# Altium PCB PCB-LAYOUT.PcbDoc (part 3 of 3)
Units mm, origin at the board's own origin, x right, y up, seen from the top; angles counter-clockwise.
Board outline 90 x 80.5 mm, 4 copper layers (Top Layer, Int1 (GND), Int2 (PWR), Bottom Layer), stack 1.564 mm thick; 224 components, 118 nets, 645 pads, 657 vias.
Unrouted connection lines stored in the file: 1.
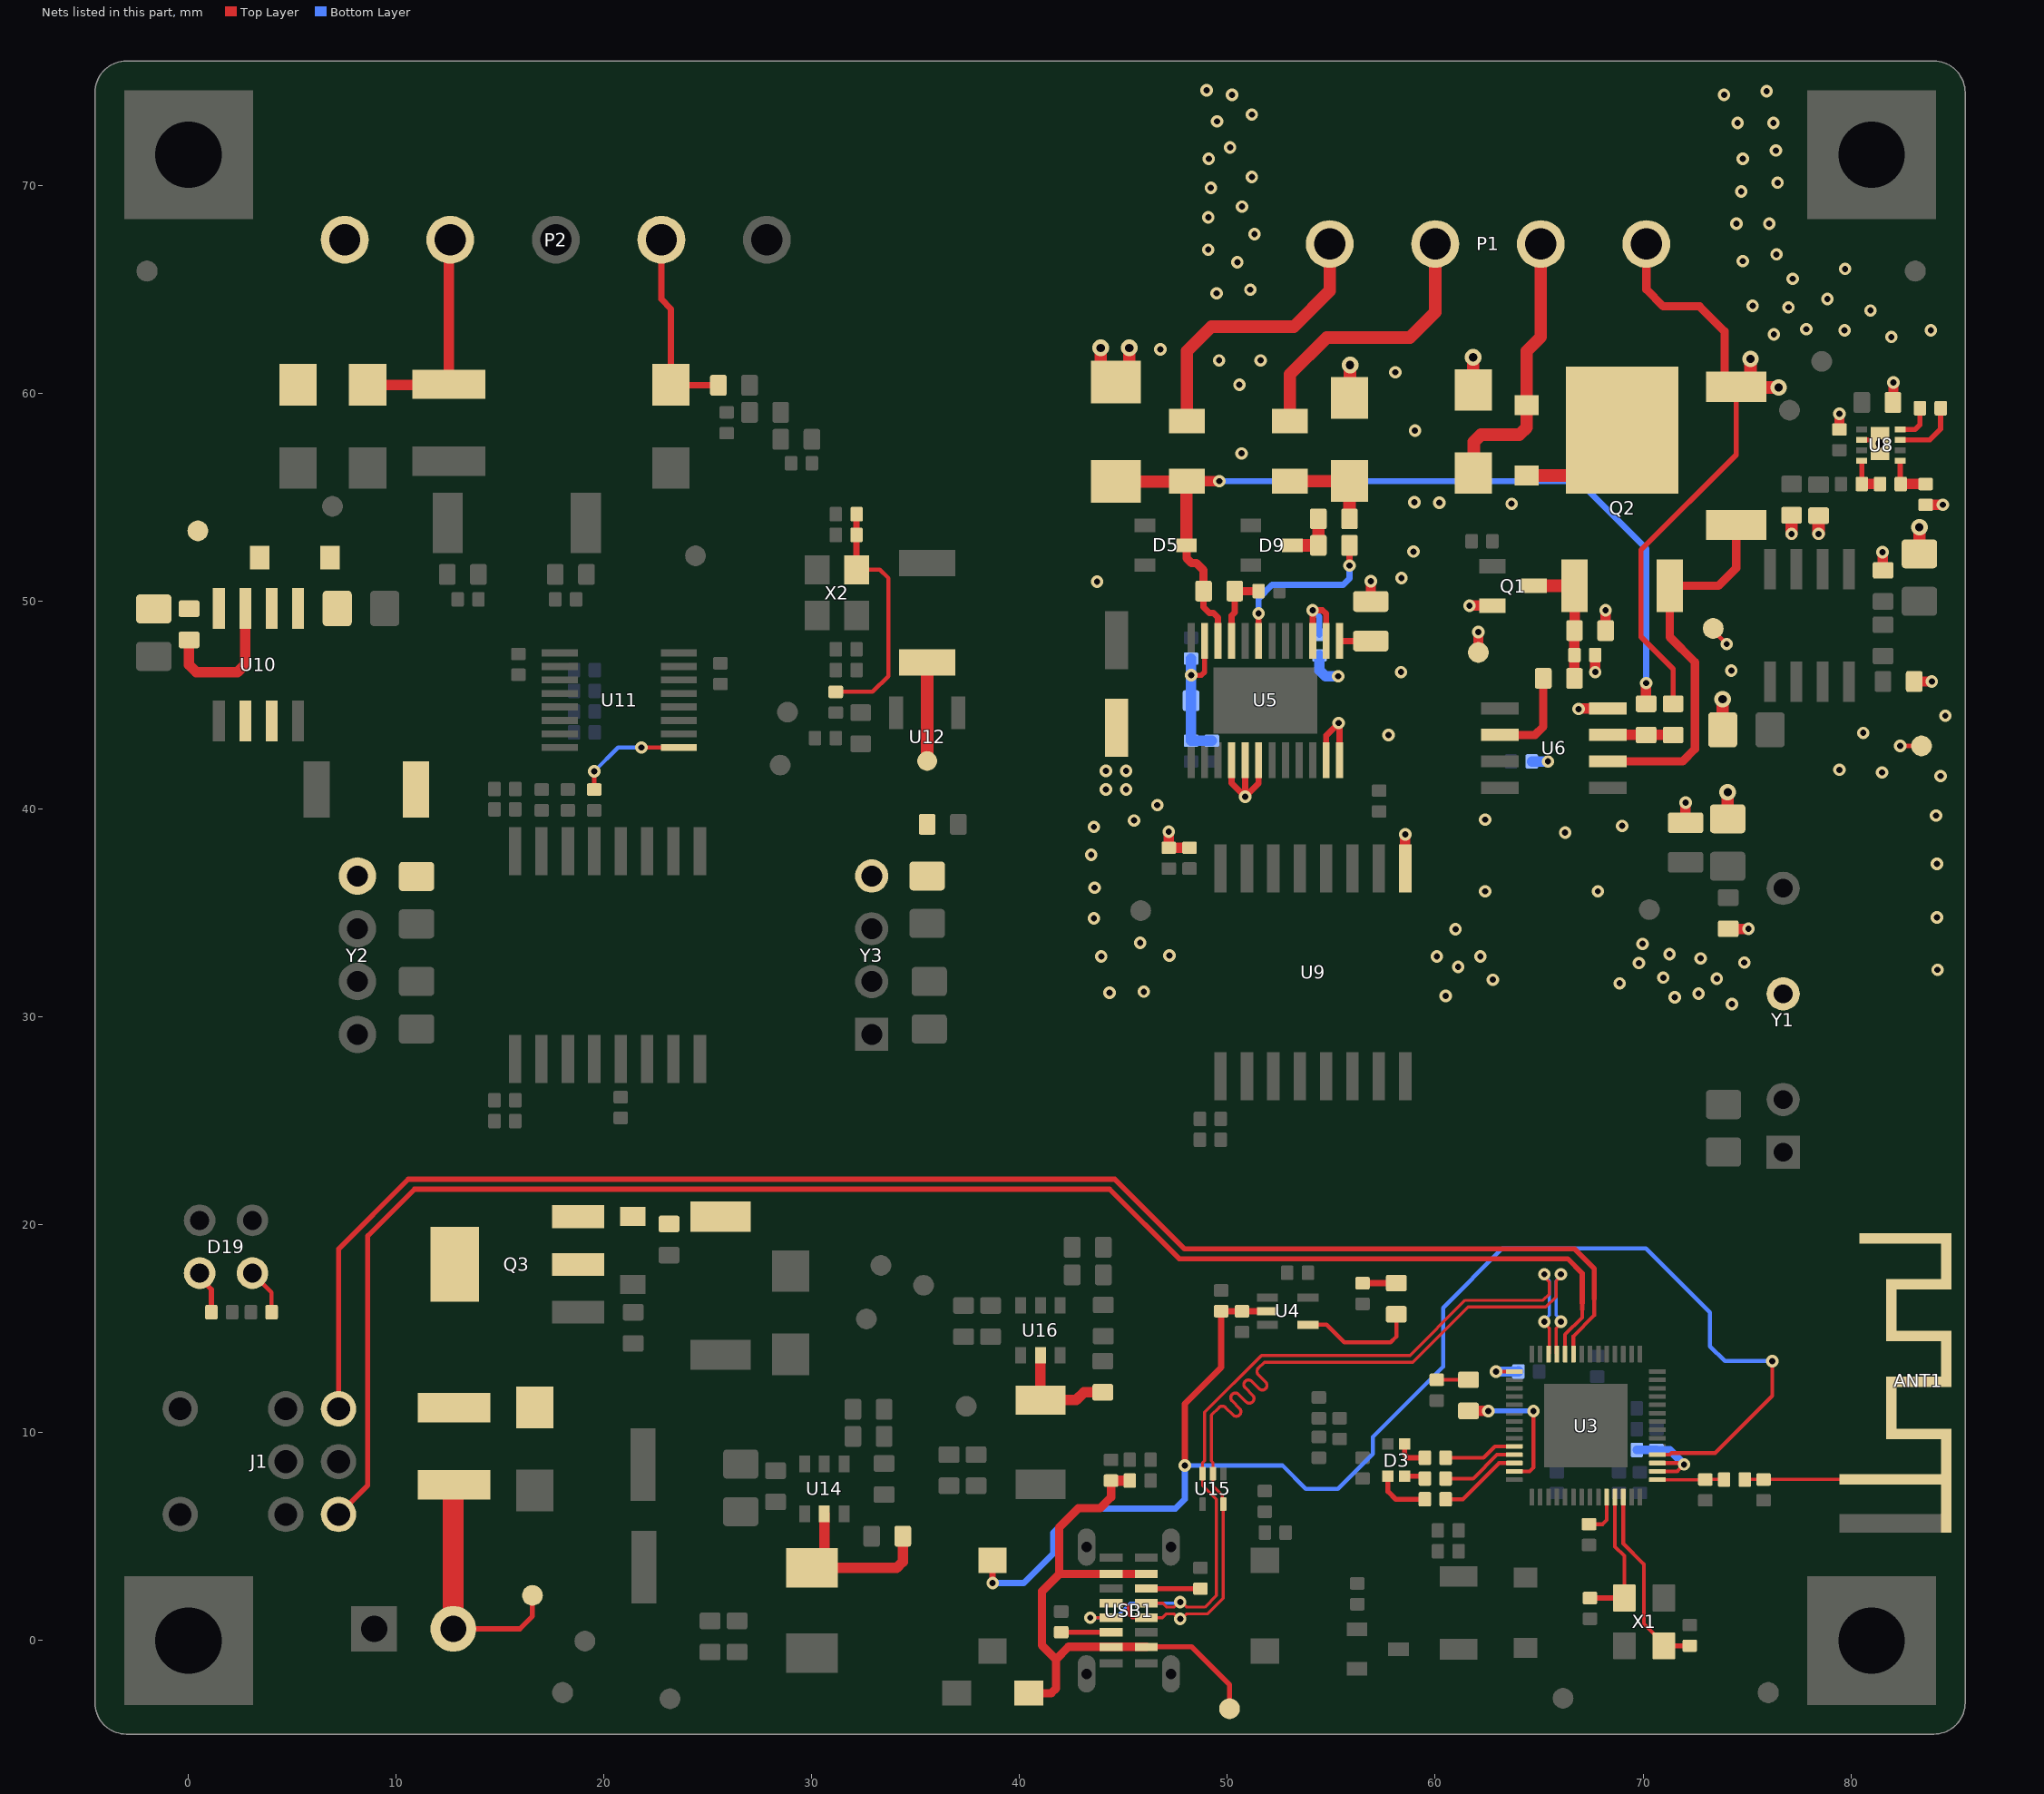
[diagram p5: the nets of this part, all layers, seen from the top]

## Via types
v1: diameter 0.6, hole 0.3, Top Layer to Bottom Layer, tented both sides, 570 vias
v2: diameter 1, hole 0.4, Top Layer to Bottom Layer, tented both sides, 48 vias
v3: diameter 0.8, hole 0.4, Top Layer to Bottom Layer, tented both sides, 36 vias
v4: diameter 1, hole 0.5, Top Layer to Bottom Layer, tented both sides, 3 vias

## Nets (pads, with @x,y where several pads share a name; then routed paths per layer and width w, separated by ;. In a path a pad name is that pad's centre, name@x,y a point inside that pad or via, vN(x,y) a via of type N, cw(c..) or ccw(c..) an arc to the next point about the centre after c; other vN are vias at no path point) (continued)
GND_2: C19.1 C20.1 C21.1 C22.1 C23.2 C25.1 C26.1 C27.2 C28.1 C30.1 C31.1 C34.1 C35.1 C36.1 C37.1 C38.1 C39.1 C41.1 D7.2 D8.2 D10.1 P1.1 Q1.S R11.2 R13.1 R16.2 R20.1 R21.1 R23.1 R24.1 R27.1 T5.1 T6.1 T7.1 U5.4 U5.5 U5.6 U5.11 U5.12 U5.23 U6.4 U8.2 U8.9 U9.9 Y1.4 | length 81.2
  Top Layer w0.2: T7.1@73.375,48.7 73.375,48.6 v1(74.025,47.95) ; v1(82.375,43.05) T6.1@83.4,43.05
  Top Layer w0.25: v1(48.25,46.45) 48.75,46.45 48.901,46.601 U5.23@48.901,48.1 ; R20.1@71.45,45.075 71.45,46.75 69.9,48.3 69.9,52.475 74.483,57.058 R16.2@74.483,60.325 ; U8.2@80.523,57.776 81.224,57.776 v3(81.4,57.6)
  Top Layer w0.3: U5.4@50.199,42.367 50.199,41.251 v1(50.85,40.6) ; U5.5@50.849,42.367 50.85,42.366 v1(50.85,40.6) ; U5.6@51.499,42.367 51.499,41.249 v1(50.85,40.6) ; U5.11@54.75,42.367 54.75,43.55 v1(55.35,44.15) 55.4,44.1 U5.12@55.4,42.367
  Top Layer w0.4: P1.1@70.16,67.2 70.16,65.015 70.975,64.2 72.725,64.2 73.925,63 73.925,60.85 74.45,60.325 R16.2@74.483,60.325
  Top Layer w0.5: v1@47.175,38.925 C34.1@47.175,38.15 C35.1@48.175,38.15 ; R23.1@56.9,50 v1(56.9,50.975) ; U9.9@58.558,37.157 v1(58.558,38.792) ; v1(61.65,49.8) Q1.S@62.75,49.8 ; T5.1@62.075,47.55 v1(62.075,48.525) ; v1(66.9,44.825) 66.927,44.825 66.95,44.848 U6.4@68.308,44.848 ; v1(67.7,46.6) C19.1@67.7,47.425 ; R11.2@68.2,48.6 v1(68.2,49.575) ; R13.1@72.05,39.35 v1(72.05,40.325) ; C26.1@74.1,34.25 v1(75.075,34.25) ; R16.2@74.483,60.325 74.725,60.325 R16.2@75.2,60.8 ; C41.1@79.452,58.276 v1(79.452,59.026) ; v1(81.525,52.375) 81.538,52.362 81.538,51.513 R21.1@81.55,51.5 ; C36.1@82.049,59.623 v1(82.049,60.54) ; R24.1@83.05,46.15 v1(83.9,46.15) ; R27.1@83.602,54.65 v1(84.425,54.65)
  Top Layer w0.6: v3(43.9,62.2) 43.9,61.276 44.624,60.552 D7.2@44.625,60.552 45.275,61.202 v3(45.275,62.2) ; D10.1@55.87,59.797 55.9,59.827 v3(55.9,61.375) ; v3(61.825,61.75) 61.825,60.18 D8.2@61.83,60.176 ; C27.2@73.828,43.822 v3(73.828,45.297) ; C25.1@74.075,39.543 v3(74.075,40.825) ; v3(75.175,61.675) 75.175,60.825 R16.2@75.2,60.8 ; R16.2@75.675,60.3 v3(76.525,60.3) ; v1(77.15,53.25) C37.1@77.15,54.15 ; v1(78.45,53.25) C38.1@78.45,54.125 ; C28.1@83.3,52.293 v3(83.3,53.575)
  Bottom Layer w0.5: C22.1@48.25,47.25 v1(48.25,46.45) C30.1@48.25,45.225 C31.1@48.25,43.3 C20.1@49.25,43.3 ; C21.1@54.425,47.4 54.425,46.693 54.718,46.4 v1(55.325,46.4) ; C39.1@64.65,42.3 v1(65.425,42.3) ; v1(75.075,34.25) cw(c75.075,34.225) v1@75.1,34.225
  other v1: 74.275,30.625 71.525,30.95 60.5,31.025 72.675,31.125 44.325,31.175 45.975,31.225 68.875,31.625 62.775,31.8 73.55,31.85 70.975,31.9 84.175,32.275 61.104,32.417 69.8,32.6 74.875,32.625 72.775,32.825 43.925,32.925 60.075,32.925 62.175,32.925 47.204,32.962 71.275,33.025 69.975,33.525 45.8,33.575 60.975,34.225 43.575,34.75 84.15,34.8 62.4,36.05 67.825,36.05 43.6,36.225 84.15,37.375 43.444,37.807 66.25,38.875 47.175,38.925 43.575,39.15 69,39.2 45.507,39.463 62.4,39.5 84.1,39.7 46.625,40.2 44.15,40.95 45.125,40.95 84.325,41.6 81.5,41.775 44.15,41.85 45.125,41.85 79.45,41.9 57.75,43.575 80.6,43.675 84.55,44.5 58.35,46.6 74.25,46.675 43.725,50.95 58.375,51.125 58.95,52.4 63.675,54.7 60.2,54.75 59,54.775 50.675,57.125 59.025,58.225 50.575,60.425 58.075,61.025 49.6,61.6 51.6,61.6 46.775,62.125 81.95,62.725 76.3,62.85 79.7,63.05 83.85,63.05 77.862,63.1 80.95,64 77,64.15 75.275,64.222 78.875,64.55 49.475,64.825 51.1,65 77.2,65.525 79.725,66 50.475,66.325 74.8,66.375 76.425,66.7 49.075,66.925 51.3,67.675 74.5,68.175 76.075,68.175 49.079,68.48 50.7,69 74.725,69.725 49.2,69.9 76.475,70.15 51.175,70.425 49.1,71.3 74.8,71.3 76.4,71.7 50.125,71.85 74.55,73.025 76.275,73.025 49.5,73.1 51.175,73.425 50.225,74.375 73.9,74.375 75.95,74.55 49,74.6
GPIO36: D2.A U3.41 | length 6.8
  Top Layer w0.18: U3.41@63.805,8.145 64.545,8.145 64.725,8.325 v1(64.725,11.05)
  Top Layer w0.5: D2.A@61.6,11.05 v1(62.55,11.05)
  Bottom Layer w0.25: v1(62.55,11.05) v1(64.725,11.05)
GPIO46: R3.2 U3.52 | length 2
  Top Layer w0.18: R3.2@67.4,5.6 68.05,5.6 68.25,5.8 U3.52@68.25,6.9
I_OUT: F2.2 P1.3 | length 13.8
  Top Layer w0.6: F2.2@53.001,58.677 53.001,60.926 54.775,62.7 58.775,62.7 60,63.925 P1.3@60,67.2
I_OUT_R: R17.1 U5.19 | length 8.4
  Top Layer w0.3: U5.19@51.499,48.1 v1(51.499,49.424) ; v1(55.875,51.725) R17.1@55.875,52.7
  Bottom Layer w0.3: v1(51.499,49.424) 51.499,50.149 52.15,50.8 55.575,50.8 55.875,51.1 v1(55.875,51.725)
I_OUT_RR: D9.3 R17.2 R18.1 | length 2.5
  Top Layer w0.6: D9.3@53.126,52.701 R17.2@54.374,52.701 ; R17.2@54.375,52.7 R18.1@54.375,53.975
I_OUT_RRF: D10.2 F2.1 R18.2 | length 4.7
  Top Layer w0.6: F2.1@53.001,55.787 55.858,55.787 55.875,55.77 R18.2@55.875,53.975
LED1.BK: D3.4 R9.2 | length 2.7
  Top Layer w0.25: D3.4@57.725,7.907 57.725,7.175 58.1,6.8 R9.2@59.5,6.8
LED1.GK: D3.2 R7.2 | length 1
  Top Layer w0.25: D3.2@58.525,7.907 59.393,7.907 R7.2@59.5,7.8
LED1.RK: D3.1 R6.2 | length 1.5
  Top Layer w0.25: D3.1@58.525,9.457 58.525,8.946 58.671,8.8 R6.2@59.5,8.8
LED_+5V_FIELD_PWR: D19.4 R53.2 | length 2.1
  Top Layer w0.25: D19.4@0.535,17.681 0.535,17.463 1.1,16.898 R53.2@1.1,15.8
LED_+5V_USB_PWR: D19.2 R54.2 | length 2.3
  Top Layer w0.2: D19.2@3.075,17.681 4,16.756 R54.2@4,15.8
LM_VOUT: C47.2 D11.2 D12.1 P2.5 R28.2 T8.1 U10.4
LM_VOUT_R: R28.1 U10.2 U10.3 U10.6 U10.7 | length 6.9
  Top Layer w0.5: R28.1@0.025,48.15 0.025,46.95 0.375,46.6 2.35,46.6 2.731,46.981 U10.3@2.731,49.663
LM_VOUTT: R25.1 R26.2 U8.4 | length 2
  Top Layer w0.25: U8.4@80.523,56.776 80.527,56.772 R25.1@80.527,55.651
  Top Layer w0.5: R25.1@80.527,55.651 R26.2@81.402,55.651
LNA_IN: C11.2 L2.1 U3.1 | length 3.2
  Top Layer w0.151: U3.1@70.695,7.745 C11.2@72.995,7.745 ; C11.2@73,7.75 L2.1@73.9,7.75
LNA_IN_A: ANT1.1 C12.2 L2.2 | length 7
  Top Layer w0.151: L2.2@74.9,7.75 ANT1.1@81.9,7.75
M+: D13.1 F3.2 P2.4 | length 10.9
  Top Layer w0.5: D13.1@8.62,60.422 12.493,60.422 F3.2@12.525,60.454 12.525,67.334 P2.4@12.596,67.405
MCU_LEDB: R9.1 U3.40 | length 4
  Top Layer w0.18: R9.1@60.5,6.8 61.325,6.8 63.07,8.545 U3.40@63.805,8.545
MCU_LEDG: R7.1 U3.39 | length 3.8
  Top Layer w0.18: R7.1@60.5,7.8 61.825,7.8 62.97,8.945 U3.39@63.805,8.945
MCU_LEDR: R6.1 U3.38 | length 3.5
  Top Layer w0.18: R6.1@60.5,8.8 62.325,8.8 62.87,9.345 U3.38@63.805,9.345
MCU_OSC_+: C14.2 U3.53 X1.1 | length 6.7
  Top Layer w0.18: U3.53@68.65,6.9 68.65,4.525 69.1,4.075 X1.1@69.1,2.05
  Top Layer w0.25: C14.2@67.45,2.05 X1.1@69.1,2.05
MCU_OSC_-: C13.2 U3.54 X1.3 | length 9.2
  Top Layer w0.18: U3.54@69.05,6.9 69.05,4.675 70.05,3.675 70.05,0.8 70.54,0.31 71,-0.15 X1.3@71,-0.25
  Top Layer w0.25: X1.3@71,-0.25 C13.2@72.25,-0.25
MCU_PWR_BANK: J1.4 U3.24 | length 79.3
  Top Layer w0.18: U3.24@66.25,13.79 66.25,14.725 67.075,15.55 67.075,15.925
  Top Layer w0.2: 67.075,15.925 67.075,16.25
  Top Layer w0.25: J1.4@7.22,6.072 8.625,7.477 8.625,19.475 10.875,21.725 44.325,21.725 47.675,18.375 66.375,18.375 67.075,17.675 67.075,16.25
MCU_PWR_FIELD: J1.6 U3.23 | length 75.8
  Top Layer w0.18: U3.23@66.65,13.79 66.65,14.65 67.65,15.65 67.65,16.075
  Top Layer w0.2: 67.65,16.075 67.65,16.45
  Top Layer w0.25: J1.6@7.22,11.152 7.22,18.845 10.575,22.2 44.575,22.2 47.925,18.85 66.7,18.85 67.65,17.9 67.65,16.45
NetC40_1: C40.1 U8.7 | length 3.2
  Top Layer w0.25: U8.7@82.377,57.776 83.801,57.776 84.325,58.3 C40.1@84.325,59.3
NetC40_2: C40.2 U8.8 | length 1.8
  Top Layer w0.25: U8.8@82.377,58.277 83.102,58.277 83.325,58.5 C40.2@83.325,59.3
NetD2_K: D2.K R2.2 | length 1.5
  Top Layer w0.18: R2.2@60.075,12.55 D2.K@61.6,12.55
NetR23_2: R23.2 U5.13 | length 1.5
  Top Layer w0.3: U5.13@55.4,48.1 R23.2@56.9,48.1
NRST: C17.2 R5.1 SW1.2 U3.4 U4.2 | length 71.8
  Top Layer w0.18: U3.4@70.695,8.945 71.295,8.945 71.375,9.025 73.475,9.025 76.226,11.776 76.226,13.449 v1(76.225,13.45)
  Top Layer w0.3: v1(38.7,2.775) SW1.2@38.7,3.861 ; v1(47.95,8.425) 47.95,11.4 49.7,13.15 R5.1@49.7,15.85 C17.2@50.7,15.85 U4.2@51.925,15.85
  Bottom Layer w0.2: v1(47.95,8.425) 52.65,8.425 53.775,7.3 55.325,7.3 57,8.975 57,9.8 60.383,13.183 60.383,16.019 63.228,18.864 70.149,18.864 73.225,15.788 73.225,14.163 73.938,13.45 v1(76.225,13.45)
  Bottom Layer w0.3: v1(38.7,2.775) 40.2,2.775 41.625,4.2 41.625,5.2 42.775,6.35 47.5,6.35 47.95,6.8 v1(47.95,8.425)
OP_+: R19.1 R20.2 U6.3 | length 3.1
  Top Layer w0.5: U6.3@68.308,43.578 68.311,43.575 R19.1@70.15,43.575 R20.2@71.45,43.575
OP_-: Q2.3 R16.1 U6.2 | length 18.4
  Top Layer w0.4: U6.2@68.308,42.308 71.908,42.308 72.5,42.9 72.5,47.075 71.285,48.29 Q2.3@71.285,50.754 73.629,50.754 74.483,51.608 R16.1@74.483,53.675
OP_-_VOUT: R10.1 U6.6 | length 4.6
  Top Layer w0.4: U6.6@63.109,43.578 64.803,43.578 65.2,43.975 R10.1@65.2,46.3
OP_-_VOUT_R: C19.2 Q1.D Q2.1 R10.2 R11.1 | length 6.4
  Top Layer w0.5: R10.2@66.7,46.3 C19.2@66.7,47.425 R11.1@66.7,48.6 66.704,48.604 66.704,50.747 Q2.1@66.708,50.751
  Top Layer w0.6: Q1.D@64.75,50.75 64.751,50.751 Q2.1@66.708,50.751
REFOUT: C21.2 U5.14 U5.15 | length 4.8
  Top Layer w0.3: U5.15@54.1,48.1 v1(54.1,49.575) 54.575,49.575 54.75,49.399 U5.14@54.75,48.1
  Bottom Layer w0.3: v1(54.1,49.575) 54.425,49.249 C21.2@54.425,48.4
S_V_SYS: C70.2 D15.1 Q3.3 R45.1
SCLK_R: R31.1 U11.1 | length 5.4
  Top Layer w0.2: R31.1@19.525,40.95 v1(19.525,41.825) ; v1(21.8,42.975) U11.1@23.599,42.975
  Bottom Layer w0.2: v1(19.525,41.825) 20.675,42.975 v1(21.8,42.975)
SINK+: D6.2 D8.1 P1.2 | length 13.5
  Top Layer w0.6: D8.1@61.83,56.178 61.851,56.199 61.851,57.674 62.202,58.025 64.052,58.025 64.404,58.376 D6.2@64.404,59.448 64.404,62.054 65.08,62.73 P1.2@65.08,67.2
SINK+_D: D6.1 Q2.2 | length 5.5
  Top Layer w0.6: D6.1@64.404,56.062 66.812,56.062 Q2.2@68.994,58.244
SW: C69.1 L3.1 U14.5 | length 8.6
  Top Layer w0.5: U14.5@30.6,6.1 30.6,4.1 L3.1@30,3.5 34.082,3.5 34.375,3.793 C69.1@34.375,5.025
SW1: C79.1 L4.1 U16.5 | length 5.3
  Top Layer w0.5: U16.5@41.002,13.732 41,13.73 L4.1@41,11.575 42.725,11.575 43.099,11.949 43.999,11.949 C79.1@44,11.95
TRIG_LED_A: D4.A U4.4 | length 5.8
  Top Layer w0.2: U4.4@53.875,15.2 54.775,15.2 55.625,14.35 57.85,14.35 58.125,14.625 D4.A@58.125,15.7
TRIG_LED_K: D4.K R8.2 | length 1.6
  Top Layer w0.3: R8.2@56.5,17.2 D4.K@58.125,17.2
USB-C_MCU_CC1: R52.2 USB1.A5 | length 2.6
  Top Layer w0.25: USB1.A5@46.1,2.502 R52.2@48.698,2.502
USB-C_MCU_CC2: R51.2 USB1.B5 | length 2.4
  Top Layer w0.25: R51.2@42,0.4 42.002,0.401 USB1.B5@44.398,0.401
USB-C_MCU_D_N: U3.25 U15.2 U15.5 USB1.A7 USB1.B7 | length 44.3
  Top Layer w0.146: USB1.B7@44.431,1.768 45.082,1.768 45.225,1.625 45.225,1.275 45.4,1.1 46.879,1.1 47.066,1.288 47.412,1.288 47.65,1.05 v1(47.725,1.05) 47.801,1.05 48.038,1.287 49.048,1.287 49.8,2.039 U15.5@49.8,6.565 49.755,6.61 49.755,6.995 49.3,7.45 U15.2@49.3,8.035 49.3,8.575 49.225,8.65 49.225,10.85 49.592,11.217 cw(c49.75,11.059) 49.907,11.217 50.265,10.859 ccw(c50.423,11.017) 50.58,10.859 ccw(c50.423,11.017) 50.58,11.175 50.223,11.532 cw(c50.38,11.69) 50.223,11.848 cw(c50.38,11.69) 50.538,11.848 50.896,11.49 ccw(c51.053,11.648) 51.211,11.49 ccw(c51.053,11.648) 51.211,11.805 50.853,12.163 cw(c51.011,12.321) 50.853,12.478 cw(c51.011,12.321) 51.169,12.478 51.523,12.124 ccw(c51.681,12.282) 51.839,12.124 ccw(c51.681,12.282) 51.839,12.439 51.484,12.794 cw(c51.642,12.952) 51.484,13.109 51.774,13.399 51.799,13.399 58.924,13.399 61.574,16.049 65.324,16.049 65.813,16.538 65.813,17.3 66.05,17.537 v1(66.05,17.625) ; U3.25@65.85,13.79 65.813,13.827 65.813,15.037 66.05,15.274 v1(66.05,15.35)
  Bottom Layer w0.146: v1(66.05,15.35) 66.05,15.426 65.813,15.663 65.813,17.312 66.05,17.549 v1(66.05,17.625)
USB-C_MCU_D_P: U3.26 U15.3 USB1.A6 USB1.B6 | length 42.8
  Top Layer w0.146: v1(43.4,1.1) USB1.B6@44.398,1.1 ; USB1.A6@46.1,1.801 46.899,1.801 47.086,1.614 47.412,1.614 47.649,1.85 v1(47.725,1.85) 47.801,1.85 48.038,1.613 48.913,1.613 49.474,2.174 49.474,6.801 48.8,7.475 U15.3@48.8,8.035 48.8,8.55 48.899,8.649 48.899,10.985 51.639,13.725 58.789,13.725 61.439,16.375 65.189,16.375 65.487,16.673 65.487,17.265 65.25,17.502 v1(65.25,17.625) ; v1(65.25,15.35) 65.25,15.274 65.487,15.037 65.487,13.827 U3.26@65.45,13.79
  Bottom Layer w0.146: v1(43.4,1.1) 44.625,1.1 45.325,1.8 47.675,1.8 v1(47.725,1.85) ; v1(65.25,15.35) 65.25,15.426 65.487,15.663 65.487,17.312 65.25,17.549 v1(65.25,17.625)
V+: D14.1 P2.2 R40.1 | length 9.5
  Top Layer w0.3: P2.2@22.756,67.405 22.756,64.544 23.22,64.08 D14.1@23.22,60.422 23.243,60.4 R40.1@25.5,60.4
V_IN: F4.1 P3.2 T13.1 | length 12
  Top Layer w0.25: P3.2@12.744,0.567 15.942,0.567 16.55,1.175 T13.1@16.55,2.175
  Top Layer w1: P3.2@12.744,0.567 12.744,7.465 F4.1@12.775,7.496
V_IN_F: D16.1 F4.2 Q3.2
V_OUT: F1.2 P1.4 | length 13.7
  Top Layer w0.6: F1.2@48.051,58.677 48.051,62.051 49.225,63.225 53.2,63.225 54.92,64.945 P1.4@54.92,67.2
V_OUT_R: C29.1 R14.1 U5.21 | length 3.6
  Top Layer w0.3: U5.21@50.199,48.1 50.199,49.324 50.35,49.475 R14.1@50.35,50.5
  Top Layer w0.4: R14.1@50.35,50.5 C29.1@51.5,50.5
V_SENSE: D5.3 D7.1 F1.1 R14.2 R19.2 U5.22 | length 42.9
  Top Layer w0.3: R14.2@48.85,50.5 48.85,49.725 49.125,49.45 49.325,49.45 49.551,49.224 U5.22@49.551,48.1
  Top Layer w0.4: D5.3@48.026,52.701 48.039,52.688 48.039,52.084 48.274,51.85 48.5,51.85 48.85,51.5 R14.2@48.85,50.5
  Top Layer w0.5: F1.1@48.051,55.787 v1(49.613,55.787) ; R19.2@70.15,45.075 v1(70.15,46.075)
  Top Layer w0.6: D7.1@44.625,55.77 F1.1@48.033,55.77 ; D5.3@48.026,52.701 48.026,55.762 F1.1@48.033,55.77 ; F1.1@48.051,55.787 F1.1@48.033,55.77
  Bottom Layer w0.3: v1(49.613,55.787) 66.913,55.787 70.15,52.55 v1(70.15,46.075)
VBUS: C74.2 D18.2 FB1.1 T16.1 USB1.A4B9 USB1.B4A9 | length 29.3
  Top Layer w0.25: USB1.B4A9@46.1,-0.3 48.275,-0.3 50.1,-2.125 T16.1@50.1,-3.275
  Top Layer w0.4: D18.2@40.432,-2.531 41.519,-2.531 41.75,-2.3 41.75,-0.9 ; FB1.1@44.4,7.7 44.4,6.9 43.875,6.375 42.825,6.375 41.901,5.451 41.901,3.201 ; USB1.B4A9@46.1,-0.3 USB1.B4A9@44.398,-0.3 42.35,-0.3 41.75,-0.9 ; USB1.A4B9@46.1,3.201 USB1.A4B9@44.398,3.201 41.901,3.201 ; 41.75,-0.9 41.075,-0.225 41.075,2.375 41.901,3.201
  Top Layer w0.5: FB1.1@44.4,7.7 C74.2@45.3,7.7
VDD3P3: C5.2 L1.2 U3.2 U3.3 | length 5.3
  Top Layer w0.18: U3.2@70.695,8.145 71.645,8.145 v1(71.975,8.475) 71.905,8.545 U3.3@70.695,8.545
  Bottom Layer w0.4: C5.2@69.7,9.175 L1.2@70.65,9.175 70.665,9.16 71.29,9.16 v1(71.975,8.475)
VDD_SPI: C6.2 U3.29 | length 1.9
  Top Layer w0.18: v1(62.93,12.945) U3.29@63.805,12.945
  Bottom Layer w0.5: v1(62.93,12.945) 63.995,12.945 C6.2@64,12.95
VFB: R26.1 R27.2 U8.5 | length 2.3
  Top Layer w0.25: U8.5@82.377,56.776 82.377,55.676 R26.1@82.402,55.651
  Top Layer w0.5: R26.1@82.402,55.651 83.601,55.651 R27.2@83.602,55.65
VOUT_H_ISO: C45.1 C46.1 D11.1 R29.2 U10.1 Y2.4
VOUT_L_ISO: C54.2 C55.2 R37.2 U12.2 Y3.4 | length 4.7
  Top Layer w0.6: U12.2@35.549,42.326 R37.2@35.55,47.068 R37.2@35.55,47.068
XO: C57.2 C58.2 R38.2 X2.4 | length 11.9
  Top Layer w0.2: R38.2@31.15,45.65 32.925,45.65 33.675,46.4 33.675,51.125 33.275,51.525 X2.4@32.15,51.525
  Top Layer w0.3: X2.4@32.15,51.525 32.15,53.2 C58.2@32.15,54.2
pads on no net: FID1.1 FID2.1 FID3.1 FID4.1 U3.7 U3.8 U3.14 U3.21 U3.22 U3.27 U3.28 U3.30 U3.31 U3.32 U3.33 U3.34 U3.35 U3.36 U3.37 U3.44 U3.45 U3.47 U3.48 U3.49 U3.50 U3.51 U4.1 U5.16 U5.18 U5.20 U6.1 U6.5 U6.8 U7.5 U7.8 U10.5 U10.8 U13.12 U15.1 USB1.1 USB1.A8 USB1.B8 X2.1
copper on no net:
  other v2: -2.5,-2.5 2.5,-2.5 78.5,-2.5 83.5,-2.5 0,-2.3 81,-2.3 -1.6,-1.7 79.4,-1.7 1.7,-1.6 82.7,-1.6 -2.3,0 2.3,0 78.7,0 83.3,0 -1.7,1.6 79.3,1.6 1.6,1.7 82.6,1.7 0,2.3 81,2.3 -2.5,2.5 2.5,2.5 78.5,2.5 83.5,2.5 -2.5,69 2.5,69 78.5,69 83.5,69 0,69.2 81,69.2 -1.6,69.8 79.4,69.8 1.7,69.9 82.7,69.9 -2.3,71.5 2.3,71.5 78.7,71.5 83.3,71.5 -1.7,73.1 79.3,73.1 1.6,73.2 82.6,73.2 0,73.8 81,73.8 -2.5,74 2.5,74 78.5,74 83.5,74

## Polygon pours and split planes (outlines as drawn)
+5V_SYS on Top Layer "+5V_SYS_L01_P023" (solid, remove dead copper, pour order 23): 41.35,16.7 41.35,15.65 41.15,15.45 36.675,15.45 36.525,15.6 36.525,16.725 36.675,16.875 41.175,16.875
+3V3 on Top Layer "+3V3_L01_P022" (solid, remove dead copper, pour order 22): 38.892,8.175 36.3,8.175 35.975,7.85 35.975,6.525 37.2,5.3 41.025,5.3 42.625,6.9 42.625,8.4 42.1,8.925 40.183,8.925
GND_2 on Top Layer "GND_2_L01_P007" (solid, remove dead copper, pour order 7): 43.5,40.75 44.125,40.125 45.125,40.125 45.75,40.75 45.75,45.25 45.575,45.425 43.725,45.425 43.5,45.2
C_SOUND on Top Layer "C_SOUND_L01_P020" (solid, remove dead copper, pour order 20): 65.048,0.677 65.4,0.325 65.4,-1.025 65.025,-1.4 57.675,-1.4 57.45,-1.175 57.45,0.4 57.727,0.677
+5V_FIELD on Top Layer "+5V_FIELD_L01_P018" (solid, remove dead copper, pour order 18): 27.925,0.85 27.275,0.2 24.425,0.2 24.05,-0.175 24.05,-1.65 25.625,-3.225 31.25,-3.225 31.9,-2.575 31.9,0.475 31.525,0.85
+24V_FIELD on Top Layer "+24V_FIELD_L01_P016" (solid, remove dead copper, pour order 16): 25.125,7.55 30.5,7.55 31.05,8.1 31.05,9.125 30.075,10.1 30.075,12.225 30.625,12.775 30.625,14.75 30.176,15.199 24.573,15.223 20.225,10.875 20.225,6.75 20.85,6.125 23.7,6.125
S_V_SYS on Top Layer "S_V_SYS_L01_P014" (solid, pour order 14): 17.5,21.2 17.125,20.825 17.125,19.7 17.45,19.375 27.25,19.375 27.425,19.55 27.425,20.925 27.15,21.2
V_IN_F on Top Layer "V_IN_F_L01_P013" (solid, remove dead copper, pour order 13): 16.525,19.25 16.525,20.1 16.225,20.4 11.125,20.4 10.3,19.575 10.3,10.55 11.05,9.8 17.8,9.8 18.525,10.525 18.525,12.675 16.8,14.4 16.8,16.35 17.75,17.3 20.05,17.3 20.275,17.525 20.275,18.675 20.025,18.925 16.85,18.925
GND_1 on Top Layer "GND_1_L01_P003" (solid, remove dead copper, pour order 3): 7.25,35.25 6.825,34.825 6.825,33.625 7.175,33.275 13.225,33.275 13.45,33.5 13.45,34.875 13.075,35.25
ADC_5V_ISO on Top Layer "ADC_5V_ISO_L01_P009" (solid, pour order 9): 79.125,48.35 84.375,48.35 84.7,48.675 84.7,50.825 84.475,51.05 82.55,51.05 82.2,50.7 81.025,50.7 80.225,49.9 79.125,49.9 79.125,52.625 78.95,52.8 77,52.8 76.825,52.625 76.825,45.05 77.1,44.775 78.875,44.775 79.125,45.025
ADJ_LM on Top Layer "ADJ_LM_L01_P010" (solid, remove dead copper, pour order 10): 79.8,47.925 79.525,47.65 79.525,45.025 79.775,44.775 82.15,44.775 82.35,44.975 82.35,47.7 82.125,47.925
ADC_24_ISO on Top Layer "ADC_24_ISO_L01_P008" (solid, remove dead copper, pour order 8): 78.65,35.725 77.975,35.05 71.8,35.05 70.8,36.05 70.8,37.9 71.2,38.3 78.15,38.3 78.65,37.8
LM_VOUT on Top Layer "LM_VOUT_L01_P005" (solid, remove dead copper, pour order 5): 0.025,56.375 -3,53.35 -3,49.075 -2.575,48.65 -0.875,48.65 -0.525,49 0.55,49 0.875,48.675 0.875,48.475 1.025,48.325 1.65,48.325 1.825,48.5 1.825,50.825 2.25,51.25 4,51.25 4.3,51.55 4.3,52.875 3.625,53.55 3.625,58.05 4.475,58.9 6.125,58.9 6.65,59.425 6.65,63.15 9.8,66.3 9.8,68.6 8.7,69.7 6.425,69.7 0.025,63.3
LM_VOUT_R on Top Layer "LM_VOUT_R_L01_P004" (solid, pour order 4): 2.475,42.825 2.275,43.025 2.275,50.65 2.45,50.825 4.275,50.825 4.475,50.625 4.475,43.025 4.275,42.825
VOUT_H_ISO on Top Layer "VOUT_H_ISO_L01_P002" (solid, remove dead copper, pour order 2): 6.825,36.25 6.825,37.725 8.525,39.425 8.525,43.8 4.875,47.45 4.875,53 5.4,53.525 7.9,53.525 8.35,53.075 8.35,48.575 13.1,43.825 13.1,36.675 12.25,35.825 7.25,35.825
GND_1 on Top Layer "GND_1_L01_P001" (solid, remove dead copper, pour order 1): 37.7,35.3 32.15,35.3 31.675,34.825 31.675,33.725 32.125,33.275 37.675,33.275 38.1,33.7 38.1,34.9
VOUT_L_ISO on Top Layer "VOUT_L_ISO_L01_P000" (solid, pour order 0): 36.225,38.475 36.725,37.651 36.725,36.075 36.525,35.875 32.375,35.875 31.775,36.475 31.775,37.674 33.9,39.799 33.9,42.75 34.925,43.775 36.107,43.775 36.975,42.874 36.975,40.7 36.225,39.95
GND on Int1 (GND) "GND_L02_P027" (solid, remove dead copper, pour order 27): -3.2,30.5 -4.2,29.5 -4.2,-3 -2.9,-4.3 84.1,-4.3 85.2,-3.2 85.2,3.3 84.5,4 79.5,4 79.2,4.3 79.2,20.5 79.6,20.9 84.5,20.9 85.2,21.6 85.2,28.1 84.475,28.825 42.925,28.825 42.5,28.4 42.5,27.6 41.9,27 39.1,27 38.4,27.7 38.4,29.6 37.5,30.5
GND_2 on Int1 (GND) "GND_2_L02_P012" (solid, pour order 12): 43.2,75.7 42.3,74.8 42.3,30.975 43.45,29.825 83.9,29.825 85.2,31.125 85.2,74.8 84.275,75.7
GND_1 on Int1 (GND) "GND_1_L02_P011" (solid, pour order 11): -3.246,75.754 -4.2,74.8 -4.2,34 -3.2,33 37.7,33 38.7,34 38.7,74.8 37.801,75.699
+3V3 on Int2 (PWR) "+3V3_L03_P028" (solid, remove dead copper, pour order 28): -3.2,30.5 -4.2,29.5 -4.2,-3 -2.9,-4.3 84.1,-4.3 85.2,-3.2 85.2,3.3 84.5,4 79.5,4 79.2,4.3 79.2,20.5 79.6,20.9 84.5,20.9 85.2,21.6 85.2,28.1 84.475,28.825 42.925,28.825 42.5,28.4 42.5,27.6 41.9,27 39.1,27 38.4,27.7 38.4,29.6 37.5,30.5
GND_1 on Int2 (PWR) "GND_1_L03_P026" (solid, pour order 26): -3.246,75.754 -4.2,74.8 -4.2,34 -3.2,33 37.7,33 38.7,34 38.7,74.8 37.801,75.699
GND_2 on Int2 (PWR) "GND_2_L03_P025" (solid, pour order 25): 43.2,75.7 42.3,74.8 42.3,30.975 43.45,29.825 83.9,29.825 85.2,31.125 85.2,74.8 84.275,75.7
GND on Bottom Layer "GND_L04_P029" (solid, remove dead copper, pour order 29): -3.2,30.5 -4.2,29.5 -4.2,-3 -2.9,-4.3 84.1,-4.3 85.2,-3.2 85.2,3.3 84.5,4 79.5,4 79.2,4.3 79.2,20.5 79.6,20.9 84.5,20.9 85.2,21.6 85.2,28.1 84.475,28.825 42.925,28.825 42.5,28.4 42.5,27.6 41.9,27 39.1,27 38.4,27.7 38.4,29.6 37.5,30.5

## Keep-outs
Keep-Out Layer:
  region: 3.6,3.595 3.6,-3.7 -3.576,-3.7 -3.576,3.595
  region: 84.6,3.595 84.6,-3.7 77.424,-3.7 77.424,3.595
  region: 85.5,20.1 85.5,4.7 79.3,4.7 79.3,20.1
  region: 84.6,75.095 84.6,67.8 77.424,67.8 77.424,75.095
  region: 3.6,75.095 3.6,67.8 -3.576,67.8 -3.576,75.095
  region: 72.399,69.27 72.399,64.77 67.899,64.77 67.899,69.27
  region: 30.075,69.475 30.075,64.975 25.575,64.975 25.575,69.475
  region: 20,69.5 20,65 15.5,65 15.5,69.5

## Other copper
Top Layer:
  pour cut-out: 173 vertices and 0 holes, not listed, extent 74.34,4.946 85.104,19.854

## Silkscreen, mask and mechanical layers (free items; w line width, h text height)
Top Overlay:
  drawing of 38 lines, arcs and shapes, not listed
  text "L+" at 8.795,75.45 h2.5 r180
  text "mA+" at 15.12,75.45 h2.5 r180
  text "mA−" at 21.47,75.45 h2.5 r180
  text "V+" at 25.595,75.45 h2.5 r180
  text "V-" at 29.725,75.45 h2.5 r180
  text "V+" at 55.699,75.45 h2.5 r180
  text "mA+" at 61.381,75.45 h2.5 r180
  text "SIM+" at 67.057,75.45 h2.5 r180
  text "COM" at 72.574,75.45 h2.5 r180
  text "INPUT MEASURE" at 37.5,63.096 h2.5 r90
  text "OUTPUT SOURCE" at 48.125,63.096 h2.5 r90
  text "RF / SENSE" at 62.112,25.857 h2.04
  text "RST" at 58.925,18.269 h2 r90
  text "TEST" at 62.415,13.612 h2 r90
  text "STAT" at 58.95,10.062 h2 r90
  text "-" at 9.563,2.468 h1.5 r90
  text "+" at 14.001,2.468 h1.5 r90
  text "RST" at 36.8,-0.951 h2 r90
  text "BOOT" at 55.4,-0.952 h2 r90
  text "MAX 28V" at 6.08,-3.273 h1.7 r90
Bottom Overlay:
  drawing of 23 lines, arcs and shapes, not listed
  text "Luca Schenetti" at -3.141,44.113 h4 r270
  text "C" at -3.117,40.204 h4 r270
  text "R" at -4.354,38.02 h4 r270
  text "W" at -3.117,35.035 h4 r270
  text "4-20 mA / 0-10 V -> SOURCE & MEASURE" at 39.398,-2.13 h0.65
  text "REV.B" at 72.174,-3.1 h1.6
  text "10/2026" at 32.229,-3.725 h0.65
Mechanical 7:
  drawing of 347 lines, arcs and shapes, not listed
  text "Layer" at 89.07,41.542 h1.52
  text "Name" at 99.482,41.542 h1.52
  text "Material" at 133.254,41.542 h1.52
  text "Thickness" at 148.49,41.542 h1.52
  text "Constant" at 164.996,41.542 h1.52
  text "Board Layer Stack" at 179.471,41.542 h1.52
  text "Top Overlay" at 99.482,38.494 h1.52
  text "Top Solder" at 99.482,35.446 h1.52
  text "SM-001" at 133.254,35.446 h1.52
  text "0,025mm" at 148.49,35.446 h1.52
  text "4" at 164.996,35.446 h1.52
  text "Top Surface Finish" at 99.482,32.398 h1.52
  text "PbSn" at 133.254,32.398 h1.52
  text "0,020mm" at 148.49,32.398 h1.52
  text "1" at 89.07,29.35 h1.52
  text "Top Layer" at 99.482,29.35 h1.52
  text "CF-004" at 133.254,29.35 h1.52
  text "0,035mm" at 148.49,29.35 h1.52
  text "Dielectric 1" at 99.482,26.302 h1.52
  text "PP-017" at 133.254,26.302 h1.52
  text "0,099mm" at 148.49,26.302 h1.52
  text "4.3" at 164.996,26.302 h1.52
  text "2" at 89.07,23.254 h1.52
  text "Int1 (GND)" at 99.482,23.254 h1.52
  text "CF-004" at 133.254,23.254 h1.52
  text "0,015mm" at 148.49,23.254 h1.52
  text "Dielectric 3" at 99.482,20.206 h1.52
  text "Core-039" at 133.254,20.206 h1.52
  text "1,265mm" at 148.49,20.206 h1.52
  text "4.8" at 164.996,20.206 h1.52
  text "3" at 89.07,17.158 h1.52
  text "Int2 (PWR)" at 99.482,17.158 h1.52
  text "CF-004" at 133.254,17.158 h1.52
  text "0,015mm" at 148.49,17.158 h1.52
  text "Dielectric 5" at 99.482,14.11 h1.52
  text "PP-017" at 133.254,14.11 h1.52
  text "0,099mm" at 148.49,14.11 h1.52
  text "4.3" at 164.996,14.11 h1.52
  text "4" at 89.07,11.062 h1.52
  text "Bottom Layer" at 99.482,11.062 h1.52
  text "CF-004" at 133.254,11.062 h1.52
  text "0,035mm" at 148.49,11.062 h1.52
  text "Bottom Surface Finish" at 99.482,8.014 h1.52
  text "PbSn" at 133.254,8.014 h1.52
  text "0,020mm" at 148.49,8.014 h1.52
  text "Bottom Solder" at 99.482,4.966 h1.52
  text "SM-001" at 133.254,4.966 h1.52
  text "0,025mm" at 148.49,4.966 h1.52
  text "4" at 164.996,4.966 h1.52
  text "Bottom Overlay" at 99.482,1.918 h1.52
Drill Drawing:
  circle w0.254: c89.806,67.422 r0.847
  circle w0.254: c89.806,59.802 r0.508
  circle w0.254: c89.806,59.802 r0.847
  lines w0.254: 88.959,55.145 88.959,55.568 89.383,55.992 88.959,56.415 88.959,56.838 89.383,56.838 89.806,56.415 90.229,56.838 90.653,56.838 90.653,56.415 90.229,55.992 90.653,55.568 90.653,55.145 90.229,55.145 89.806,55.568 89.383,55.145 88.959,55.145 ; 88.959,62.765 89.806,63.188 90.653,62.765 90.229,63.612 90.653,64.458 89.806,64.035 88.959,64.458 89.383,63.612 88.959,62.765 ; 88.959,70.808 89.383,70.808 89.383,70.385 90.229,70.385 90.229,70.808 90.653,70.808 90.653,71.655 90.229,71.655 90.229,72.078 89.383,72.078 89.383,71.655 88.959,71.655 88.959,70.808 ; 88.959,74.195 90.653,74.195 90.653,75.888 88.959,75.888 88.959,74.195 ; 88.959,78.852 89.806,78.005 90.653,78.852 89.806,79.698 88.959,78.852 ; 88.959,82.238 89.383,82.238 89.806,81.815 90.229,82.238 90.653,82.238 90.229,82.662 90.653,83.085 90.229,83.085 89.806,83.508 89.383,83.085 88.959,83.085 89.383,82.662 88.959,82.238 ; 88.959,87.318 90.653,87.318 89.806,85.625 88.959,87.318 ; 88.959,91.128 90.653,91.128 89.806,89.435 88.959,91.128 ; 88.959,93.245 90.653,93.245 90.653,94.938 88.959,94.938 88.959,93.245 ; 89.298,74.534 90.314,74.534 90.314,75.55 89.298,75.55 89.298,74.534 ; 89.298,90.79 90.314,90.79 89.806,89.774 89.298,90.79
  lines w0.381: 87.441,54.002 445.53,54.002 ; 87.441,95.912 445.53,95.912 ; 101.433,50.192 101.433,99.722 ; 116.669,50.192 116.669,99.722 ; 146.378,50.192 146.378,99.722 ; 159.227,50.192 159.227,99.722 ; 177.866,50.192 177.866,99.722 ; 215.954,50.192 215.954,99.722 ; 230.937,50.192 230.937,99.722 ; 249.88,50.192 249.88,99.722 ; 292.539,50.192 292.539,99.722 ; 314.225,50.192 314.225,99.722 ; 348.098,50.192 348.098,99.722 ; 381.972,50.192 381.972,99.722 ; 409.904,50.192 409.904,99.722 ; 87.441,50.192 445.53,50.192 445.53,99.722 87.441,99.722 87.441,50.192
  text "Symbol" at 89.727,97.055 h1.83
  text "Count" at 102.576,97.055 h1.83
  text "Hole Size" at 117.812,97.055 h1.83
  text "Plated" at 147.521,97.055 h1.83
  text "Hole Type" at 160.37,97.055 h1.83
  text "Drill Layer Pair" at 179.009,97.055 h1.83
  text "Via/Pad" at 217.097,97.055 h1.83
  text "Pad Shape" at 232.08,97.055 h1.83
  text "Template" at 251.023,97.055 h1.83
  text "Description" at 293.682,97.055 h1.83
  text "Hole Tolerance (+)" at 315.368,97.055 h1.83
  text "Hole Tolerance (-)" at 349.241,97.055 h1.83
  text "Hole Length" at 383.115,97.055 h1.83
  text "Routed Path Length" at 411.047,97.055 h1.83
  text "2" at 102.576,93.245 h1.52
  text "1,260mm (49,61mil)" at 117.812,93.245 h1.52
  text "PTH" at 147.521,93.245 h1.52
  text "Round" at 160.37,93.245 h1.52
  text "Top Layer - Bottom Layer" at 179.009,93.245 h1.52
  text "Pad" at 217.097,93.245 h1.52
  text "(Mixed)" at 232.08,93.245 h1.52
  text "(Mixed)" at 251.023,93.245 h1.52
  text "-" at 383.115,93.245 h1.52
  text "-" at 411.047,93.245 h1.52
  text "3" at 102.576,89.435 h1.52
  text "0,500mm (19,69mil)" at 117.812,89.435 h1.52
  text "PTH" at 147.521,89.435 h1.52
  text "Round" at 160.37,89.435 h1.52
  text "Top Layer - Bottom Layer" at 179.009,89.435 h1.52
  text "Via" at 217.097,89.435 h1.52
  text "Rounded" at 232.08,89.435 h1.52
  text "v100h50m0mx0" at 251.023,89.435 h1.52
  text "-" at 383.115,89.435 h1.52
  text "-" at 411.047,89.435 h1.52
  text "4" at 102.576,85.625 h1.52
  text "0,500mm (19,70mil)" at 117.812,85.625 h1.52
  text "PTH" at 147.521,85.625 h1.52
  text "Slot" at 160.37,85.625 h1.52
  text "Top Layer - Bottom Layer" at 179.009,85.625 h1.52
  text "Pad" at 217.097,85.625 h1.52
  text "Rounded" at 232.08,85.625 h1.52
  text "r86_180h50_140r100" at 251.023,85.625 h1.52
  text "1,400mm (55,10mil)" at 383.115,85.625 h1.52
  text "0,899mm (35,40mil)" at 411.047,85.625 h1.52
  text "4" at 102.576,81.815 h1.52
  text "0,899mm (35,40mil)" at 117.812,81.815 h1.52
  text "PTH" at 147.521,81.815 h1.52
  text "Round" at 160.37,81.815 h1.52
  text "Top Layer - Bottom Layer" at 179.009,81.815 h1.52
  text "Pad" at 217.097,81.815 h1.52
  text "(Mixed)" at 232.08,81.815 h1.52
  text "(Mixed)" at 251.023,81.815 h1.52
  text "-" at 383.115,81.815 h1.52
  text "-" at 411.047,81.815 h1.52
  text "4" at 102.576,78.005 h1.52
  text "0,914mm (36,00mil)" at 117.812,78.005 h1.52
  text "PTH" at 147.521,78.005 h1.52
  text "Round" at 160.37,78.005 h1.52
  text "Top Layer - Bottom Layer" at 179.009,78.005 h1.52
  text "Pad" at 217.097,78.005 h1.52
  text "Rounded" at 232.08,78.005 h1.52
  text "c152h91" at 251.023,78.005 h1.52
  text "-" at 383.115,78.005 h1.52
  text "-" at 411.047,78.005 h1.52
  text "4" at 102.576,74.195 h1.52
  text "3,200mm (125,98mil)" at 117.812,74.195 h1.52
  text "PTH" at 147.521,74.195 h1.52
  text "Round" at 160.37,74.195 h1.52
  text "Top Layer - Bottom Layer" at 179.009,74.195 h1.52
  text "Pad" at 217.097,74.195 h1.52
  text "Rectangle" at 232.08,74.195 h1.52
  text "s620h320(Tol0-0)_3993740483" at 251.023,74.195 h1.52
  text "0,000mm (0,00mil)" at 315.368,74.195 h1.52
  text "0,000mm (0,00mil)" at 349.241,74.195 h1.52
  text "-" at 383.115,74.195 h1.52
  text "-" at 411.047,74.195 h1.52
  text "8" at 102.576,70.385 h1.52
  text "1,001mm (39,40mil)" at 117.812,70.385 h1.52
  text "PTH" at 147.521,70.385 h1.52
  text "Round" at 160.37,70.385 h1.52
  text "Top Layer - Bottom Layer" at 179.009,70.385 h1.52
  text "Pad" at 217.097,70.385 h1.52
  text "(Mixed)" at 232.08,70.385 h1.52
  text "(Mixed)" at 251.023,70.385 h1.52
  text "-" at 383.115,70.385 h1.52
  text "-" at 411.047,70.385 h1.52
  text "8" at 102.576,66.575 h1.52
  text "1,100mm (43,30mil)" at 117.812,66.575 h1.52
  text "PTH" at 147.521,66.575 h1.52
  text "Round" at 160.37,66.575 h1.52
  text "Top Layer - Bottom Layer" at 179.009,66.575 h1.52
  text "Pad" at 217.097,66.575 h1.52
  text "Rounded" at 232.08,66.575 h1.52
  text "c170h110" at 251.023,66.575 h1.52
  text "-" at 383.115,66.575 h1.52
  text "-" at 411.047,66.575 h1.52
  text "9" at 102.576,62.765 h1.52
  text "1,500mm (59,06mil)" at 117.812,62.765 h1.52
  text "PTH" at 147.521,62.765 h1.52
  text "Round" at 160.37,62.765 h1.52
  text "Top Layer - Bottom Layer" at 179.009,62.765 h1.52
  text "Pad" at 217.097,62.765 h1.52
  text "Rounded" at 232.08,62.765 h1.52
  text "c230h150m235mx235p230" at 251.023,62.765 h1.52
  text "-" at 383.115,62.765 h1.52
  text "-" at 411.047,62.765 h1.52
  text "84" at 102.576,58.955 h1.52
  text "0,400mm (15,75mil)" at 117.812,58.955 h1.52
  text "PTH" at 147.521,58.955 h1.52
  text "Round" at 160.37,58.955 h1.52
  text "Top Layer - Bottom Layer" at 179.009,58.955 h1.52
  text "Via" at 217.097,58.955 h1.52
  text "Rounded" at 232.08,58.955 h1.52
  text "(Mixed)" at 251.023,58.955 h1.52
  text "-" at 383.115,58.955 h1.52
  text "-" at 411.047,58.955 h1.52
  text "570" at 102.576,55.145 h1.52
  text "0,300mm (11,81mil)" at 117.812,55.145 h1.52
  text "PTH" at 147.521,55.145 h1.52
  text "Round" at 160.37,55.145 h1.52
  text "Top Layer - Bottom Layer" at 179.009,55.145 h1.52
  text "Via" at 217.097,55.145 h1.52
  text "Rounded" at 232.08,55.145 h1.52
  text "v60h30m0mx0" at 251.023,55.145 h1.52
  text "-" at 383.115,55.145 h1.52
  text "-" at 411.047,55.145 h1.52
  text "700 Total" at 102.576,51.335 h1.52
  text "Slot definitions :" at 89.727,47.653 h1.52
  text "Routed Path Length" at 115.957,47.653 h1.52
  text "= Calculated from tool start centre position to tool end centre position." at 143.965,47.653 h1.52
  text "Hole Length" at 115.957,45.113 h1.52
  text "= Routed Path Length + Tool Size = Slot length as defined in the PCB layout" at 133.554,45.113 h1.52
Board Shape:
  the board outline again, w0.1

## Text inside footprints (layer, text, board x,y; h text height)
D2: Mechanical 13 "+" at 62.208,10.483 h0.5 r270
D4: Mechanical 13 "+" at 58.733,15.133 h0.5 r270
U1: Top Overlay "+" at 60.611,2.248 h1 r270